# Altium PCB pyBehaviorLab_breakout_board.PcbDoc (part 1 of 4)
Units mm, origin at the board's own origin, x right, y up, seen from the top; angles counter-clockwise.
Board outline 190.01 x 159.89 mm, 2 copper layers (Top Layer, Bottom Layer); 146 components, 148 nets, 758 pads, 634 vias.
Unrouted connection lines stored in the file: 29.
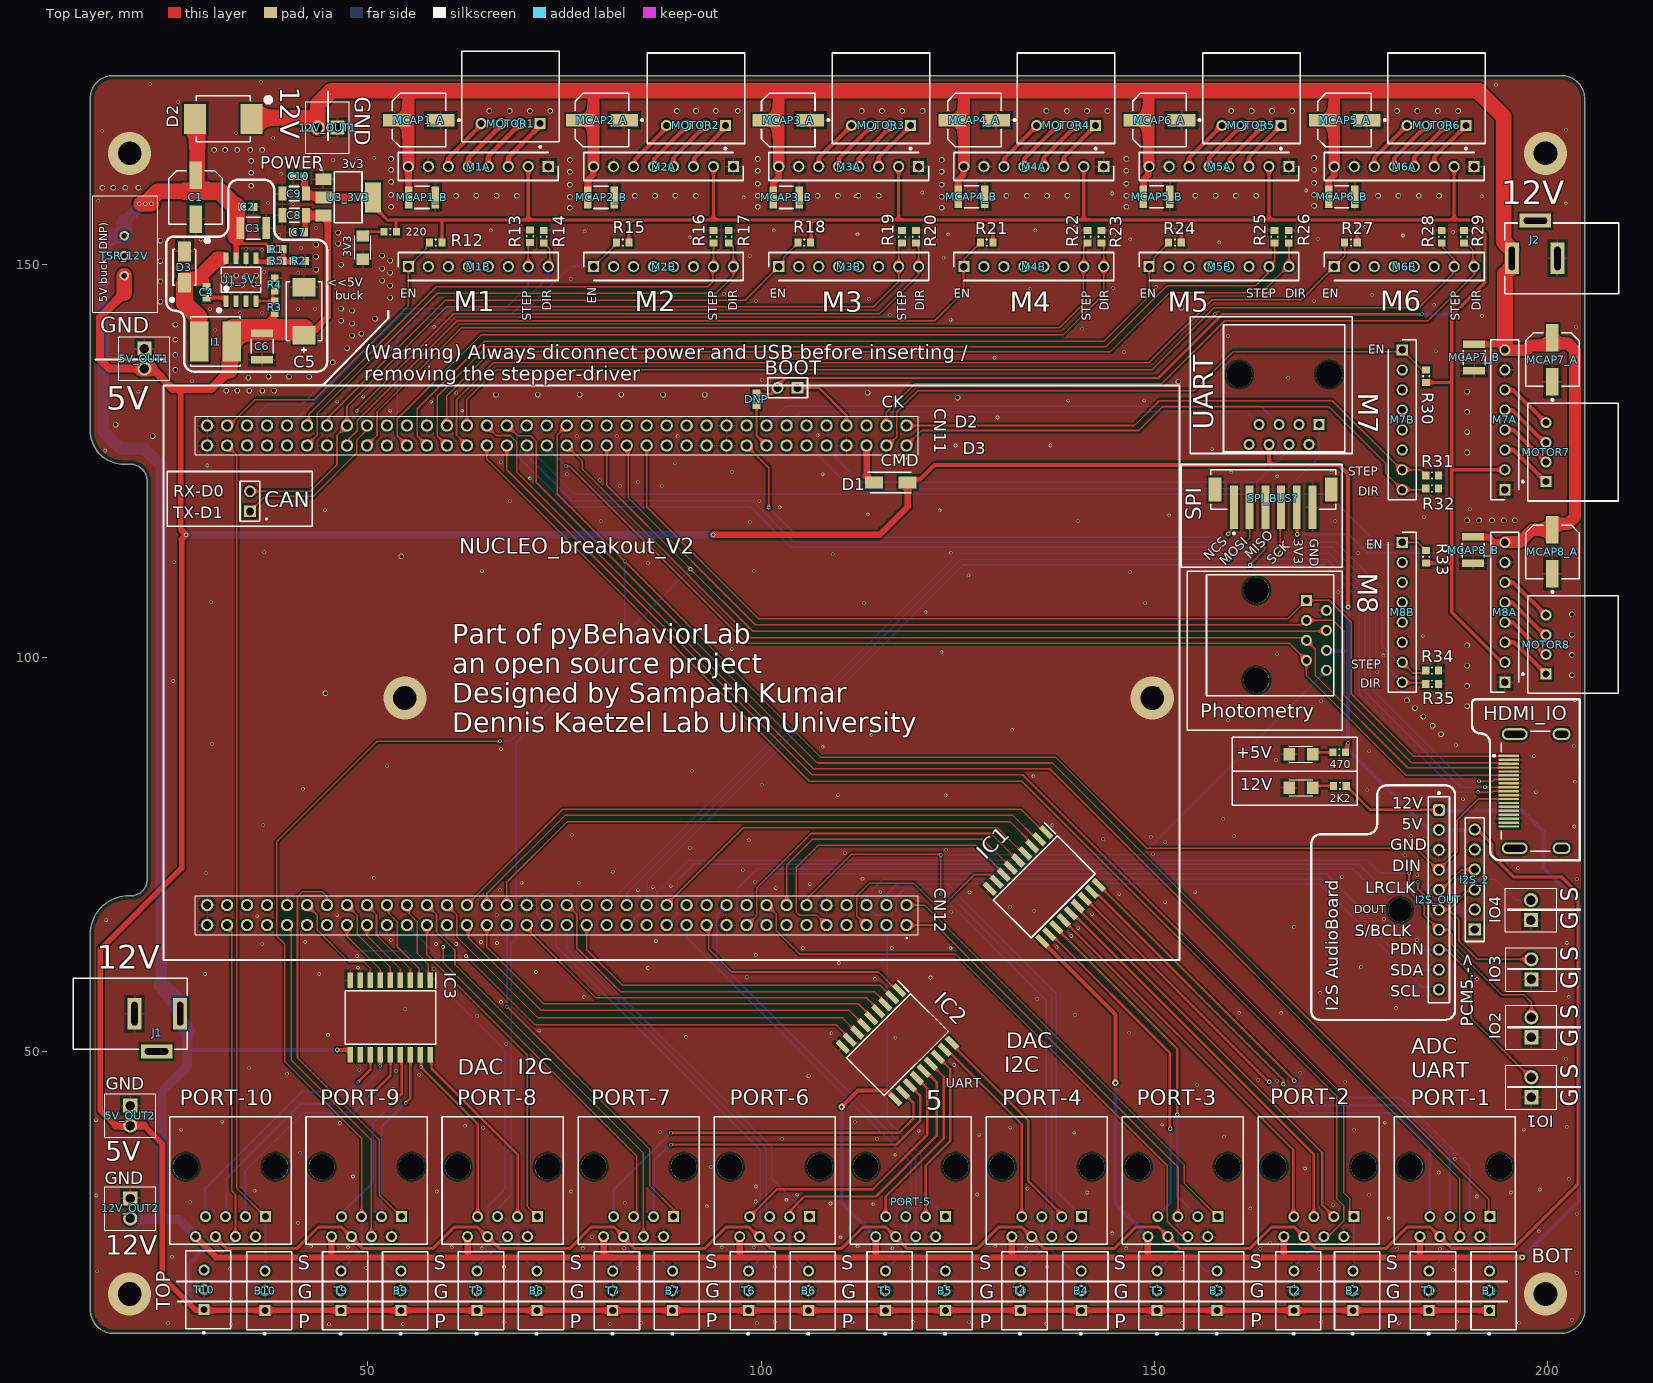
[diagram p0: Top Layer view]
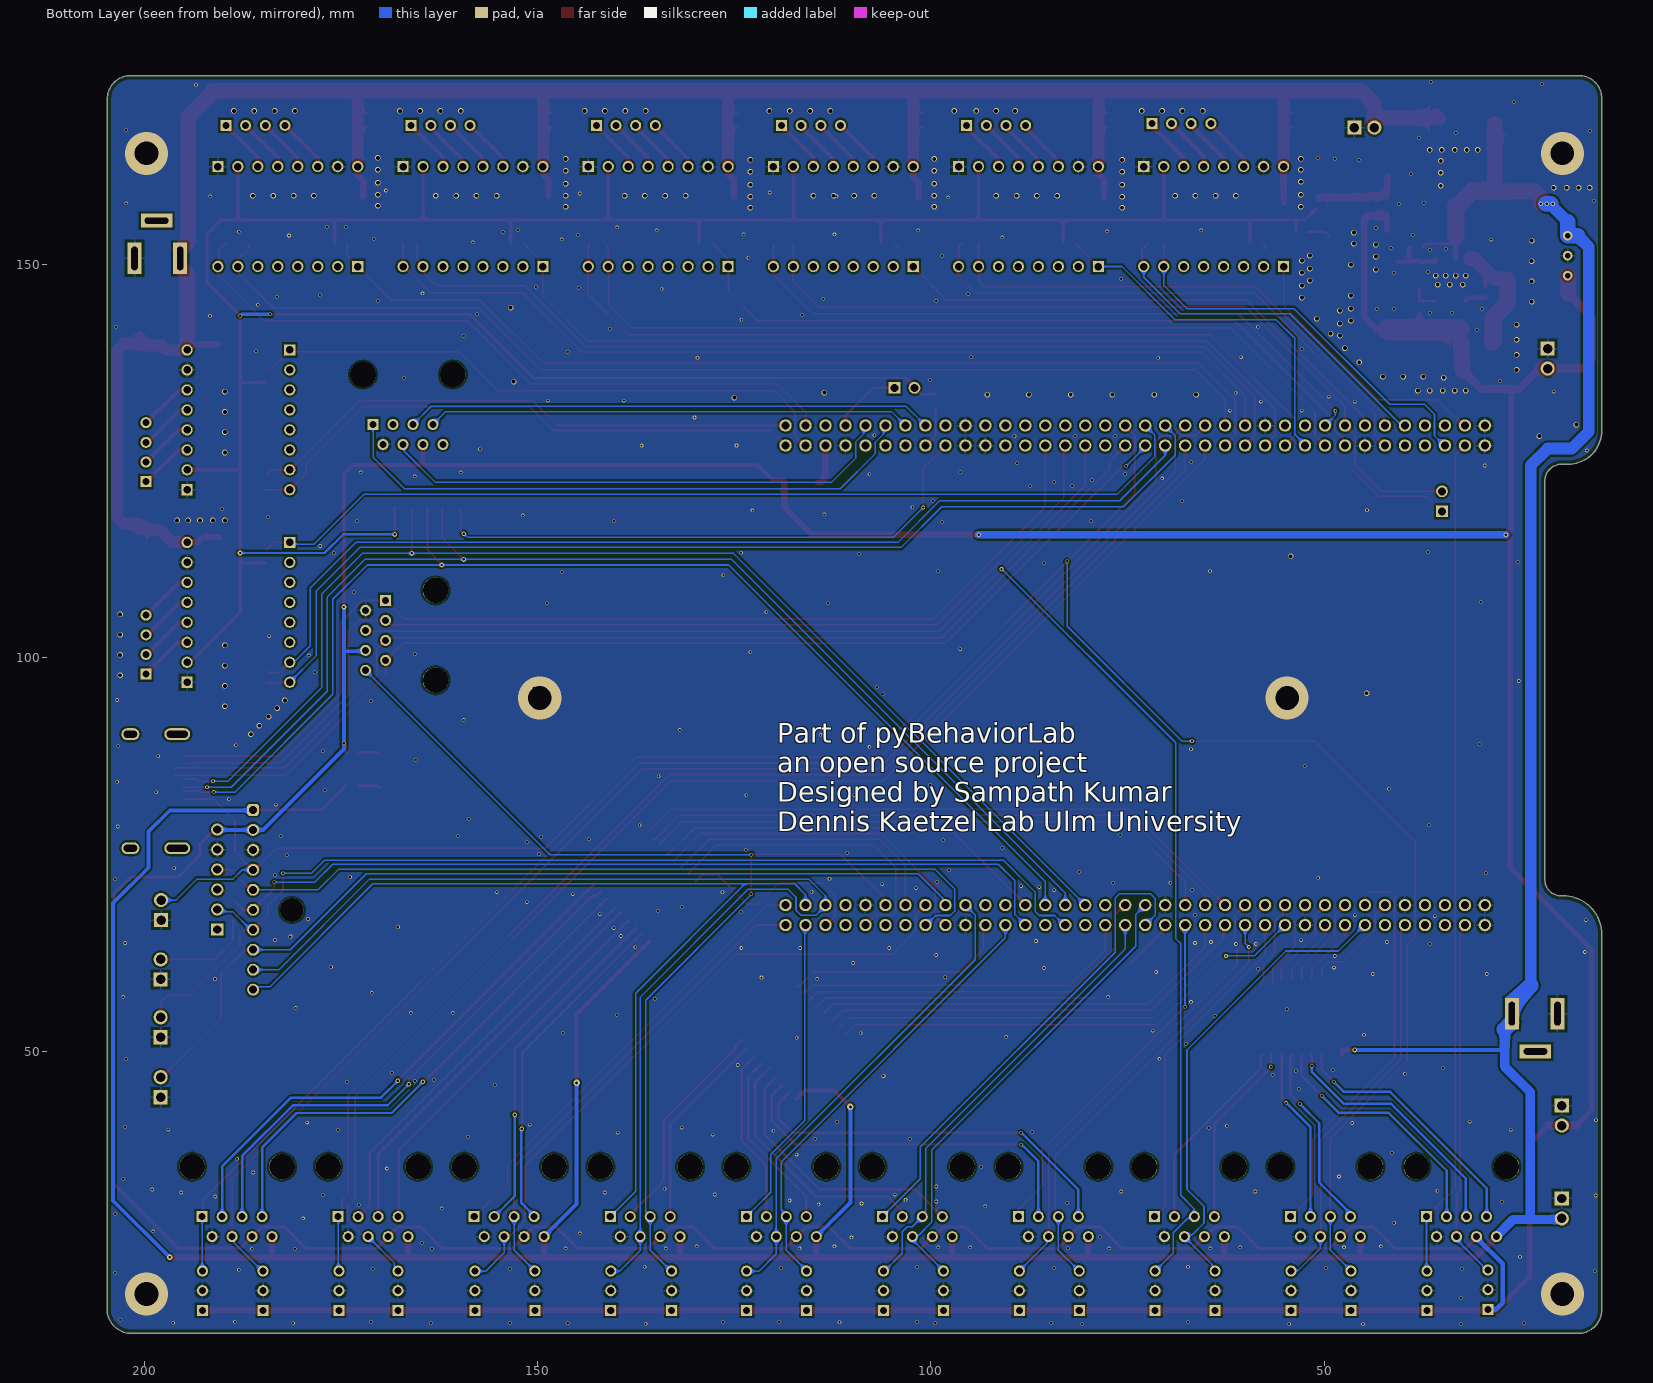
[diagram p1: Bottom Layer view, seen from below]
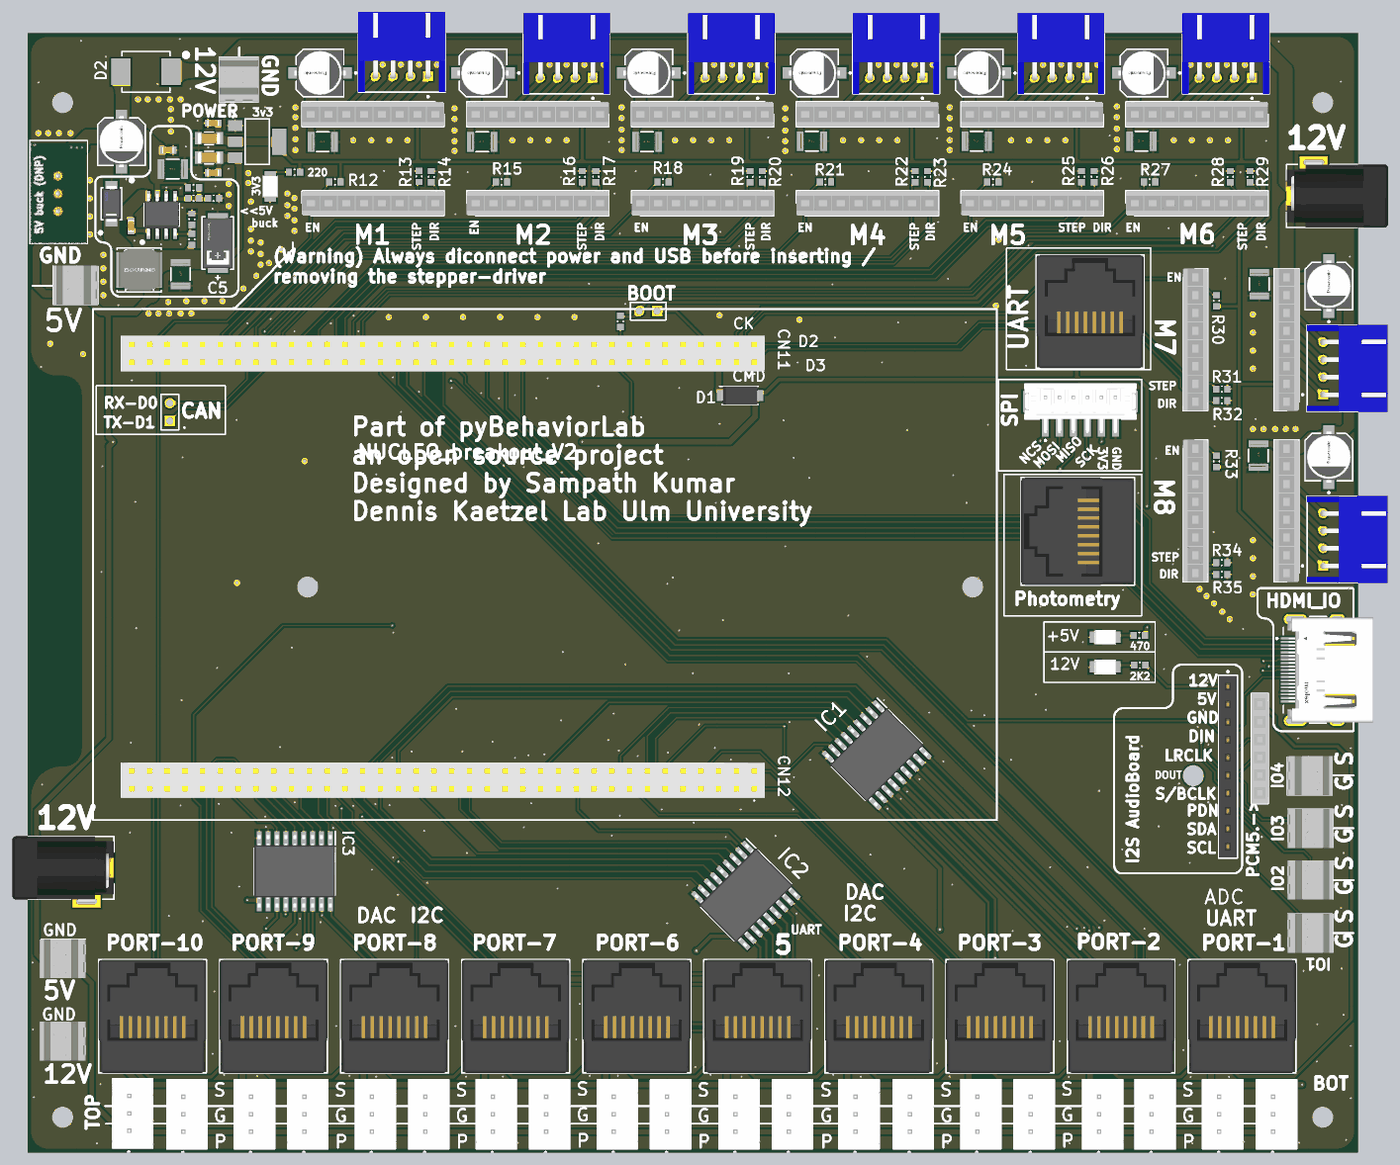
[diagram p4: 3D render of the assembled board from above, using the file's embedded part models]

## Layer stack, top to bottom
Top Solder: solder mask 0.0102, Solder Resist, Dk 3.5
Top Layer: signal copper 0.0356
Dielectric 1: dielectric 0.32, FR-4, Dk 4.8
Bottom Layer: signal copper 0.0356
Bottom Solder: solder mask 0.0102, Solder Resist, Dk 3.5

## Board outline
14.714,17.114 14.714,64.857 cw(c19.615,64.857) 19.615,69.758 19.899,69.758 ccw(c19.899,71.811) 21.953,71.811 21.953,122.468 ccw(c19.8,122.468) 19.8,124.622 18.978,124.622 cw(c18.978,128.886) 14.714,128.886 14.714,171.141 cw(c17.598,171.141) 17.598,174.025 201.732,174.025 cw(c201.732,171.05) 204.706,171.05 204.706,171.069 204.706,17.222 ccw(c204.722,17.222) 204.722,17.205 cw(c201.648,17.205) 201.648,14.132 17.697,14.132 cw(c17.697,17.114)

## Design rules (kind name [scope] priority, off if disabled: settings)
BoardOutlineClearance [All] p1: gap=0.254 ignorepadtopadclearanceinfootprint=FALSE except(0: Arc-SplitContinuation Track-SplitContinuation SMDPad-SplitContinuation THPad-SplitContinuation Via-SplitContinuation Fill-SplitContinuation Poly-SplitContinuation Region-SplitContinuation Text-SplitContinuation; 0.5: Poly-OutlineEdge Poly-CavityEdge Poly-CutoutEdge Poly-SplitBarrior)
Clearance [All] p1: gap=0.254 ignorepadtopadclearanceinfootprint=FALSE except(0.127: Arc-Arc Arc-Track Track-Track SMDPad-SMDPad; 0.2: Arc-SMDPad Track-SMDPad; 0.33: Arc-THPad Track-THPad; 0.5: THPad-THPad)
DiffPairsRouting [All] p1: maxlimit=0.203 minlimit=0.203 mostfreqgap=0.203 toplayer_minwidth=0.109 toplayer_maxwidth=0.19 toplayer_prefwidth=0.111 bottomlayer_minwidth=0.109 bottomlayer_maxwidth=0.19 bottomlayer_prefwidth=0.111 impedanceprofiledriven=TRUE maxuncoupledlength=12.7
MatchedLengths MatchedLengths_QSPI2 [InNetClass('QSPI')] p1: tolerance=7 checknetsindiffpair=FALSE checkdiffpairvsdiffpair=TRUE checkxsignals=TRUE checkothers=TRUE
PlaneClearance [All] p1: clearance=0.6
PlaneConnect [All] p1: pad.planeconnectstyle=Relief pad.reliefexpansion=0.508 pad.reliefentries=4 pad.reliefconductorwidth=0.254 pad.reliefairgap=0.254 via.planeconnectstyle=Direct via.reliefexpansion=0.508 via.reliefentries=4 via.reliefconductorwidth=0.254 via.reliefairgap=0.254
PolygonConnect [All] p1: thpad.connectstyle=Relief thpad.reliefconductorwidth=0.254 thpad.reliefentries=4 thpad.polygonreliefangle="90 Angle" thpad.airgapwidth=0.35 smdpad.connectstyle=Relief smdpad.reliefconductorwidth=0.254 smdpad.reliefentries=4 smdpad.polygonreliefangle="90 Angle" smdpad.airgapwidth=0.35 via.connectstyle=Direct via.reliefconductorwidth=0.254 via.reliefentries=4 via.polygonreliefangle="90 Angle" via.airgapwidth=0.254
RoutingVias [All] p1: holewidth=0.2 width=0.45 viastyle="Through Hole" minholewidth=0.2 minwidth=0.4 maxholewidth=3 maxwidth=5
SolderMaskExpansion [All] p1: expansion=0.102 istentingtop=FALSE
SupplyNets "Schematic Supply Nets_10" [InNet('GND')] p1: voltage=0.000
SupplyNets "Schematic Supply Nets_7" [InNet('MCU_5V')] p2: voltage=0.000
SupplyNets "Schematic Supply Nets_6" [InNet('+12V_motor')] p3: voltage=0.000
SupplyNets "Schematic Supply Nets_5" [InNet('+3V3')] p4: voltage=0.000
SupplyNets "Schematic Supply Nets_4" [InNet('+5V_CL')] p5: voltage=0.000
SupplyNets "Schematic Supply Nets_3" [InNet('MCU_3V3')] p6: voltage=0.000
SupplyNets "Schematic Supply Nets_2" [InNet('+12V')] p7: voltage=0.000
SupplyNets "Schematic Supply Nets_1" [InNet('+5V')] p8: voltage=0.000
UnRoutedNet [All] p1: checkbadconnections=TRUE
Width [All] p1: maxlimit=5 minlimit=0.1 preferedwidth=0.2 minimp=50.000000 maximp=50.000000 favimp=50.000000
26 further rules are at their usual default settings.

## Classes and differential pairs
component class pyBehaviorLab_breakout_board: 5V_OUT1 5V_OUT2 12V_OUT1 12V_OUT2 B1 B2 B3 B4 B5 B6 B7 B8 B9 B10 BOOT C1 C2 C3 C4 C5 C6 C7 C8 C9 C10 CN11 CN12 D1 D2 D3 DNP HDMI_IO I1 IC1 IC2 IC3 IO1 IO2 IO3 IO4 J1 J2 M1A M1B M2A M2B M3A M3B M4A M4B M5A M5B M6A M6B M7A M7B M8A M8B MCAP1_A MCAP1_B MCAP2_A MCAP2_B MCAP3_A MCAP3_B MCAP4_A MCAP4_B MCAP5_A MCAP5_B MCAP6_A MCAP6_B MCAP7_A MCAP7_B MCAP8_A MCAP8_B MOTOR1 MOTOR2 MOTOR3 MOTOR4 MOTOR5 MOTOR6 MOTOR7 MOTOR8 Photometry PORT-1 PORT-2 PORT-3 PORT-4 PORT-5 PORT-6 PORT-7 PORT-8 PORT-9 PORT-10 R1 R2 R3 R4 R12 R13 R14 R15 R16 R17 R18 R19 R20 R21 R22 R23 R24 R25 R26 R27 R28 R29 R30 R31 R32 R33 R34 R35 SPI_BUS? T1 T2 T3 T4 T5 T6 T7 T8 T9 T10 TSR_12V U1_5V_ UART

## Components (designator, comment, footprint, x,y, rotation, side; value= is the part's Value field where it differs from the comment)
2K2 "2K2" 0603R 173.582,83.73 r0 top value=12K1
3V3 "LTW-150TK" SML010PTT86 49.365,152.159 r180 top
5V_OUT1 "282834-2" 282834-2_1 21.59,139.319 r270 top
5V_OUT2 "282834-2" 282834-2_1 19.794,43.088 r270 top
12V "LTW-150TK" SML010PTT86 168.628,83.485 r90 top
12V_OUT1 "282834-2" 282834-2_1 46.159,167.421 r180 top
12V_OUT2 "282834-2" 282834-2_1 19.794,31.277 r270 top
220 "2K2" 0603R 52.842,154.176 r0 top value=12K1
470 "2K2" 0603R 173.511,87.998 r0 top value=12K1
+5V "LTW-150TK" SML010PTT86 168.628,87.739 r90 top
B1 "B3B-XH-A(LF)(SN)" FP-B3B-XH-A_LF_SN-MFG 193.122,19.558 r90 top
B2 "B3B-XH-A(LF)(SN)" FP-B3B-XH-A_LF_SN-MFG 175.768,19.558 r90 top
B3 "B3B-XH-A(LF)(SN)" FP-B3B-XH-A_LF_SN-MFG 158.496,19.558 r90 top
B4 "B3B-XH-A(LF)(SN)" FP-B3B-XH-A_LF_SN-MFG 141.224,19.558 r90 top
B5 "B3B-XH-A(LF)(SN)" FP-B3B-XH-A_LF_SN-MFG 123.952,19.558 r90 top
B6 "B3B-XH-A(LF)(SN)" FP-B3B-XH-A_LF_SN-MFG 106.553,19.558 r90 top
B7 "B3B-XH-A(LF)(SN)" FP-B3B-XH-A_LF_SN-MFG 89.281,19.558 r90 top
B8 "B3B-XH-A(LF)(SN)" FP-B3B-XH-A_LF_SN-MFG 72.009,19.558 r90 top
B9 "B3B-XH-A(LF)(SN)" FP-B3B-XH-A_LF_SN-MFG 54.737,19.558 r90 top
B10 "B3B-XH-A(LF)(SN)" FP-B3B-XH-A_LF_SN-MFG 37.465,19.558 r90 top
BOOT "JP2" HDR_1x2_2R54_V_M_S 104.626,134.331 r180 top
C1 "25SVPF47M" FP-OS-CON-SMT-C6-MFG 28.115,158.552 r90 top
C2 "GRM188R71H104KA93D" CAPC1608X90X35ML10T15 34.767,157.334 r180 top
C3 "" FP-CGA6P-IPC_B 35.445,154.632 r0 top
C4 "GRM188R71H104KA93D" CAPC1608X90X35ML10T15 29.497,146.483 r270 top
C5 "10TPC100M" FP-POSCAP-D2-MFG 41.876,144.066 r270 top
C6 "" FP-CGA6P-IPC_B 36.558,139.608 r270 top
C7 "GRM188R71H104KA93D" CAPC1608X90X35ML10T15 41.208,154.099 r0 top
C8 "CC1206KKX5R8BB105" FP-CC1206-1_25-MFG 40.636,156.272 r180 top value="1 uF"
C9 "CC1206KKX5R8BB105" FP-CC1206-1_25-MFG 40.633,159.026 r180 top value="1 uF"
C10 "GRM188R71H104KA93D" CAPC1608X90X35ML10T15 41.208,161.199 r0 top
CAN "JP2" HDR_1x2_2R54_V_M_S 35.017,118.64 r90 top
CN11 "SSW-136-01-S-D" SSW-136-XX-YYY-D 118.473,127 r0 top
CN12 "SSW-136-01-S-D" SSW-136-XX-YYY-D 118.473,66.04 r0 top locked
D1 "MBRA140T3G" DIOM5226X220N 116.48,122.286 r0 top
D2 "MBRS540T3G" ONSC-SMC-2-403-03_V 31.623,168.529 r180 top
D3 "B340A-13-F" FP-SMA-MFG 26.689,149.67 r90 top
DNP "10K" 0603R 99.401,132.867 r270 top value=12K1
HDMI_IO "47151-0001" FP-47151-0001-MFG 200.279,83.058 r90 top
I1 "SRN6045TA-220M" FP-SRN6045TA-MFG 30.647,140.202 r0 top
I2S_2 "Comment" SMTC-SSW-106-02-X-S 190.724,65.472 r90 top
I2S_OUT "61301011821" 61301011821 186.164,69.25 r270 top
IC1 "TBD62083AFWG,EL" SOIC127P1032X285-18N 135.999,70.901 r315 top locked
IC2 "TBD62083AFWG,EL" SOIC127P1032X285-18N 117.33,50.835 r315 top
IC3 "TBD62083AFWG,EL" SOIC127P1032X285-18N 52.875,54.278 r270 top
IO1 "282834-2" 282834-2_1 197.914,44.15 r90 top
IO2 "282834-2" 282834-2_1 197.914,51.77 r90 top
IO3 "282834-2" 282834-2_1 197.914,59.136 r90 top
IO4 "282834-2" 282834-2_1 197.866,66.675 r90 top
J1 "694106301002" 694106301002 19.794,54.772 r270 top
J2 "694106301002" 694106301002 201.785,150.784 r90 top
M1A "5-535541-6" RHDR8W76P0X254_1X8_2032X356X673P 72.938,162.467 r180 top
M1B "5-535541-6" RHDR8W76P0X254_1X8_2032X356X673P 55.162,149.753 r0 top
M2A "5-535541-6" RHDR8W76P0X254_1X8_2032X356X673P 96.479,162.467 r180 top
M2B "5-535541-6" RHDR8W76P0X254_1X8_2032X356X673P 78.702,149.753 r0 top
M3A "5-535541-6" RHDR8W76P0X254_1X8_2032X356X673P 120.02,162.467 r180 top
M3B "5-535541-6" RHDR8W76P0X254_1X8_2032X356X673P 102.243,149.753 r0 top
M4A "5-535541-6" RHDR8W76P0X254_1X8_2032X356X673P 143.561,162.467 r180 top
M4B "5-535541-6" RHDR8W76P0X254_1X8_2032X356X673P 125.783,149.753 r0 top
M5A "5-535541-6" RHDR8W76P0X254_1X8_2032X356X673P 167.102,162.467 r180 top
M5B "5-535541-6" RHDR8W76P0X254_1X8_2032X356X673P 149.323,149.753 r0 top
M6A "5-535541-6" RHDR8W76P0X254_1X8_2032X356X673P 190.643,162.467 r180 top
M6B "5-535541-6" RHDR8W76P0X254_1X8_2032X356X673P 172.863,149.753 r0 top
M7A "5-535541-6" RHDR8W76P0X254_1X8_2032X356X673P 194.55,121.37 r90 top
M7B "5-535541-6" RHDR8W76P0X254_1X8_2032X356X673P 181.503,139.15 r270 top
M8A "5-535541-6" RHDR8W76P0X254_1X8_2032X356X673P 194.55,96.903 r90 top
M8B "5-535541-6" RHDR8W76P0X254_1X8_2032X356X673P 181.503,114.683 r270 top
MCAP1_A "25SVPF47M" FP-OS-CON-SMT-C6-MFG 56.483,168.368 r180 top
MCAP1_B "" FP-CGA6P-IPC_B 56.877,158.531 r0 top
MCAP2_A "25SVPF47M" FP-OS-CON-SMT-C6-MFG 79.77,168.368 r180 top
MCAP2_B "" FP-CGA6P-IPC_B 79.656,158.531 r0 top
MCAP3_A "25SVPF47M" FP-OS-CON-SMT-C6-MFG 103.451,168.368 r180 top
MCAP3_B "" FP-CGA6P-IPC_B 103.197,158.531 r0 top
MCAP4_A "25SVPF47M" FP-OS-CON-SMT-C6-MFG 127.109,168.368 r180 top
MCAP4_B "" FP-CGA6P-IPC_B 126.738,158.623 r0 top
MCAP5_A "25SVPF47M" FP-OS-CON-SMT-C6-MFG 174.182,168.368 r180 top
MCAP5_B "" FP-CGA6P-IPC_B 150.278,158.623 r0 top
MCAP6_A "25SVPF47M" FP-OS-CON-SMT-C6-MFG 150.641,168.368 r180 top
MCAP6_B "" FP-CGA6P-IPC_B 173.819,158.623 r0 top
MCAP7_A "25SVPF47M" FP-OS-CON-SMT-C6-MFG 200.584,137.911 r90 top
MCAP7_B "" FP-CGA6P-IPC_B 190.644,138.193 r270 top
MCAP8_A "25SVPF47M" FP-OS-CON-SMT-C6-MFG 200.584,113.485 r90 top
MCAP8_B "" FP-CGA6P-IPC_B 190.517,113.695 r270 top
MOTOR1 "S4B-XH-A(LF)(SN)" JST-S4B-XH-A(LF)(SN)_V 68.158,167.929 r180 top
MOTOR2 "S4B-XH-A(LF)(SN)" JST-S4B-XH-A(LF)(SN)_V 91.699,167.697 r180 top
MOTOR3 "S4B-XH-A(LF)(SN)" JST-S4B-XH-A(LF)(SN)_V 115.24,167.697 r180 top
MOTOR4 "S4B-XH-A(LF)(SN)" JST-S4B-XH-A(LF)(SN)_V 138.781,167.697 r180 top
MOTOR5 "S4B-XH-A(LF)(SN)" JST-S4B-XH-A(LF)(SN)_V 162.322,167.697 r180 top
MOTOR6 "S4B-XH-A(LF)(SN)" JST-S4B-XH-A(LF)(SN)_V 185.863,167.697 r180 top
MOTOR7 "S4B-XH-A(LF)(SN)" JST-S4B-XH-A(LF)(SN)_V 199.781,126.15 r90 top
MOTOR8 "S4B-XH-A(LF)(SN)" JST-S4B-XH-A(LF)(SN)_V 199.781,101.683 r90 top
Photometry "615008138021" 615008138021 164.719,102.87 r270 top locked
PORT-1 "615008138021" 615008138021 188.195,33.563 r180 top locked
PORT-2 "615008138021" 615008138021 170.901,33.563 r180 top locked
PORT-3 "615008138021" 615008138021 153.606,33.563 r180 top locked
PORT-4 "615008138021" 615008138021 136.312,33.563 r180 top locked
PORT-5 "615008138021" 615008138021 119.017,33.563 r180 top locked
PORT-6 "615008138021" 615008138021 101.722,33.563 r180 top locked
PORT-7 "615008138021" 615008138021 84.428,33.563 r180 top locked
PORT-8 "615008138021" 615008138021 67.133,33.563 r180 top locked
PORT-9 "615008138021" 615008138021 49.839,33.563 r180 top locked
PORT-10 "615008138021" 615008138021 32.544,33.563 r180 top locked
R1 "680K" 0603R 38.414,151.976 r0 top value=12K1
R2 "100K" 0603R 41.263,150.476 r0 top value=12K1
R3 "10K" 0603R 38.168,144.591 r90 top value=12K1
R4 "3K2" 0603R 38.168,147.464 r90 top value=12K1
R5 "100K" 0603R 38.414,150.476 r0 top value=12K1
R12 "10K" 0603R 58.616,152.787 r180 top value=12K1
R13 "10K" 0603R 70.612,153.584 r90 top value=12K1
R14 "10K" 0603R 72.366,153.537 r90 top value=12K1
R15 "10K" 0603R 82.399,152.787 r180 top value=12K1
R16 "10K" 0603R 93.944,153.537 r90 top value=12K1
R17 "10K" 0603R 95.888,153.537 r90 top value=12K1
R18 "10K" 0603R 105.481,152.787 r180 top value=12K1
R19 "10K" 0603R 117.908,153.537 r90 top value=12K1
R20 "10K" 0603R 119.685,153.537 r90 top value=12K1
R21 "10K" 0603R 128.677,152.787 r180 top value=12K1
R22 "10K" 0603R 141.489,153.537 r90 top value=12K1
R23 "10K" 0603R 143.291,153.537 r90 top value=12K1
R24 "10K" 0603R 152.606,152.787 r180 top value=12K1
R25 "10K" 0603R 165.27,153.537 r90 top value=12K1
R26 "10K" 0603R 167.071,153.537 r90 top value=12K1
R27 "10K" 0603R 174.987,152.787 r180 top value=12K1
R28 "10K" 0603R 186.523,153.537 r90 top value=12K1
R29 "10K" 0603R 189.357,153.543 r90 top value=12K1
R30 "10K" 0603R 184.537,135.811 r90 top value=12K1
R31 "10K" 0603R 185.287,123.208 r0 top value=12K1
R32 "10K" 0603R 185.287,121.545 r0 top value=12K1
R33 "10K" 0603R 184.537,112.868 r90 top value=12K1
R34 "10K" 0603R 185.287,98.38 r0 top value=12K1
R35 "10K" 0603R 185.287,96.703 r0 top value=12K1
SPI_BUS? "B6B-PH-SM4-TB(LF)(SN)" FP-B6B-PH-SM4-TB_LF_SN-MFG 165.1,121.412 r0 top locked
T1 "B3B-XH-A(LF)(SN)" FP-B3B-XH-A_LF_SN-MFG 185.42,19.558 r90 top
T2 "B3B-XH-A(LF)(SN)" FP-B3B-XH-A_LF_SN-MFG 168.275,19.558 r90 top
T3 "B3B-XH-A(LF)(SN)" FP-B3B-XH-A_LF_SN-MFG 150.876,19.558 r90 top
T4 "B3B-XH-A(LF)(SN)" FP-B3B-XH-A_LF_SN-MFG 133.477,19.558 r90 top
T5 "B3B-XH-A(LF)(SN)" FP-B3B-XH-A_LF_SN-MFG 116.332,19.558 r90 top
T6 "B3B-XH-A(LF)(SN)" FP-B3B-XH-A_LF_SN-MFG 98.933,19.558 r90 top
T7 "B3B-XH-A(LF)(SN)" FP-B3B-XH-A_LF_SN-MFG 81.661,19.558 r90 top
T8 "B3B-XH-A(LF)(SN)" FP-B3B-XH-A_LF_SN-MFG 64.389,19.558 r90 top
T9 "B3B-XH-A(LF)(SN)" FP-B3B-XH-A_LF_SN-MFG 47.117,19.558 r90 top
T10 "B3B-XH-A(LF)(SN)" FP-B3B-XH-A_LF_SN-MFG 29.718,19.685 r90 top
TSR_12V "TSR 2-2450" "TSR 2-2450_TRP" 19.05,153.67 r270 top
U1_5V_ "TPS5420DR" D0008A_N 33.881,148.088 r90 top
U3_3V3 "NCP1117ST33T3G" ONSC-SOT-223-4-318H-01_A_V 47.51,158.547 r0 top
UART "615008138021" 615008138021 166.479,134.274 r180 top locked

## Footprints (in the part's own frame and the unit in brackets; to place one, negate y for a bottom-side part, rotate by r counter-clockwise, add the part's x,y. Pads: shape width x height; smd on the part's side, far side on the other; paste and mask are expansions set on the pad)
0603R [mm] "Chip Resistor, Body 1.6x0.8mm, IPC Medium Density"
  rect 0.9x1 smd: 1(-0.8,0) 2(0.8,0)
  silkscreen extent -0.05,-0.4 0.05,0.4, body extent -0.85,-0.47 0.85,0.47, height 0.6
282834-2_1 [mm]
  rect 1.8x1.8 hole 1.2: 1(0,0)
  round 1.8 hole 1.2: 2(2.54,0)
  silkscreen extent -1.5,-3.25 4.04,3.25, body extent -1.5,-3.25 4.04,3.25, height 9.87
61301011821 [mm] "Socket Header, Pitch 2.54 mm, THT, Vertical, single row, 10p"
  rrect50% 1.52x1.52 hole 1.02: 1(-11.43,0)
  round 1.52 hole 1.02: 2(-8.89,0) 3(-6.35,0) 4(-3.81,0) 5(-1.27,0) 6(1.27,0) 7(3.81,0) 8(6.35,0) 9(8.89,0) 10(11.43,0)
  silkscreen extent -13.68,-1.35 13.08,1.35, body extent -12.95,-1.25 12.95,1.25, height 8.55
615008138021 [mm] "Modular Jack Vertical Plastic 8P8C"
  rect 1.4x1.4 hole 0.9: 1(-4.445,4.6)
  round 1.4 hole 0.9: 2(-3.175,7.14) 3(-1.905,4.6) 4(-0.635,7.14) 5(0.635,4.6) 6(1.905,7.14) 7(3.175,4.6) 8(4.445,7.14)
  round 3.25 hole 3.25 unplated: MH1(-5.715,-1.75) MH2(5.715,-1.75)
  silkscreen extent -7.7,-8.1 7.7,8.1, body extent -7.7,-8.1 7.7,8.1, height 16.5
694106301002 [mm] "DC Power Jack Right Angled(6.4)"
  rect 4x1.8 hole 0.8 slot 3 at 0 deg: 1(0,6.35) 2(0,0.55)
  rect 1.8x4 hole 0.8 slot 3 at 90 deg: 3(4.8,3.35)
  silkscreen extent -4.5,-7.25 4.5,7.25, body extent -4.5,-7.25 5,7.25, height 10.75
CAPC1608X90X35ML10T15 [mm] "Chip Capacitor, 2-Leads, Body 1.7x0.9mm, IPC Low Density"
  rect 0.95x1.05 smd: 1(-0.725,0) 2(0.725,0)
  body extent -0.85,-0.45 0.85,0.45, height 0.9
D0008A_N [mm] "SOIC, 8-Leads, Body 5x4mm, Pitch 1.27mm, IPC Medium Density"
  rrect17% 1.45x0.6 smd: 1(-2.725,1.905) 2(-2.725,0.635) 3(-2.725,-0.635) 4(-2.725,-1.905) 5(2.725,-1.905) 6(2.725,-0.635) 7(2.725,0.635) 8(2.725,1.905)
  silkscreen extent -4.11,-2.5 1.6,2.98, body extent -3,-2.45 3,2.45, height 1.63
DIOM5226X220N [mm]
  rect 2.3x1.55 smd: 1(-2.15,0) 2(2.15,0)
  silkscreen extent -2.93,-1.3 2.61,1.3, body extent -2.61,-1.3 2.61,1.3, height 2.2
FP-47151-0001-MFG [mm]
  rect 0.3x2.6 smd paste+0 mask+0: 1(4.5,5.235) 2(4,5.235) 3(3.5,5.235) 4(3,5.235) 5(2.5,5.235) 6(2,5.235) 7(1.5,5.235) 8(1,5.235) 9(0.5,5.235) 10(0,5.235) 11(-0.5,5.235) 12(-1,5.235) 13(-1.5,5.235) 14(-2,5.235) 15(-2.5,5.235) 16(-3,5.235) 17(-3.5,5.235) 18(-4,5.235) 19(-4.5,5.235)
  rrect100% 1.5x3.3 hole 2.7 slot 0.9 at 0 deg paste-2539.97 mask+0: 20(-7.25,4.475) 21(7.25,4.475)
  rrect100% 1.5x2.3 hole 1.7 slot 0.9 at 0 deg paste-2539.97 mask+0: 22(-7.25,-1.485) 23(7.25,-1.485)
  silkscreen extent -7.63,0.04 7.63,7.23, body extent -8.1,-6.3 8.1,6.63, height 0.25
FP-B3B-XH-A_LF_SN-MFG [mm]
  rect 1.4x1.4 hole 0.9 paste-2539.97 mask+0: 1(-2.5,0.525)
  round 1.4 hole 0.9 paste-2539.97 mask+0: 2(0,0.525) 3(2.5,0.525)
  silkscreen extent -5.6,-2.88 4.95,2.88, body extent -5.05,-2.97 5.05,2.98, height 0.25
FP-B6B-PH-SM4-TB_LF_SN-MFG [mm]
  rect 1x5.5 smd paste+0 mask+0: 1(-5,-2.25) 2(-3,-2.25) 3(-1,-2.25) 4(1,-2.25) 5(3,-2.25) 6(5,-2.25)
  rect 1.6x3 smd paste+0 mask+0: 7(-7.4,0) 8(7.4,0)
  silkscreen extent -7.95,-5.7 7.95,2.5, body extent -8.3,-5.1 8.3,2.6, height 0.25
FP-CC1206-1_25-MFG [mm]
  rect 1x1.8 smd paste+0 mask+0: 1(-1.5,0) 2(1.5,0)
  silkscreen extent -0.63,-0.9 0.63,0.9, body extent -2.2,-1.25 2.2,1.25, height 0.25
FP-CGA6P-IPC_B [mm]
  rect 0.953x2.804 smd paste+0 mask+0: 1(-1.675,0) 2(1.675,0)
  silkscreen extent -0.9,-1.4 0.9,1.4, body extent -2.4,-1.65 2.4,1.65, height 0.25
FP-OS-CON-SMT-C6-MFG [mm]
  rect 3.5x1.6 smd paste+0 mask+0: 1(-2.8,0) 2(2.8,0)
  silkscreen extent -5.72,-3.4 3.4,3.4, body extent -4.8,-3.65 4.8,3.65, height 0.25
FP-POSCAP-D2-MFG [mm]
  rect 2.4x2.9 smd paste+0 mask+0: 1(-3.05,0) 2(3.05,0)
  silkscreen extent -3.75,-2.25 5.23,2.25, body extent -4.35,-2.35 4.35,2.35, height 0.25
FP-SMA-MFG [mm]
  rect 2.5x1.7 smd paste+0 mask+0: 1(-2,0) 2(2,0)
  silkscreen extent -4.35,-1.46 2.3,1.77, body extent -3.35,-1.56 3.35,1.56, height 0.25
FP-SRN6045TA-MFG [mm]
  rect 2.35x5.1 smd paste+0 mask+0: 1(-2.075,0) 2(2.075,0)
  silkscreen extent -3.15,-3.15 3.15,3.15, body extent -3.35,-3.25 3.35,3.25, height 0.25
HDR_1x2_2R54_V_M_S [mm] "Male Header, Pitch 2.54mm, 4x1 Position, Mated Height 6mm, Tail Length 3mm"
  rect 1.5x1.5 hole 1.02: 1(0,0)
  round 1.5 hole 1.02: 2(2.54,0)
  silkscreen extent -1.27,-2.14 3.81,1.27, body extent -1.27,-1.27 3.81,1.27, height 9
JST-S4B-XH-A(LF)(SN)_V [mm] "Header, 4-Leads, Body 12.4x11.5mm, Pitch 2.5mm"
  rect 1.4x1.4 hole 0.9: 1(-3.75,0)
  round 1.4 hole 0.9: 2(-1.25,0) 3(1.25,0) 4(3.75,0)
  silkscreen extent -6.2,-9.2 6.2,3.08, body extent -6.2,-9.2 6.2,2.3, height 6.15
ONSC-SMC-2-403-03_V [mil] "Molded, 2-Leads, Body 6.86x5.84mm"
  rect 110x150 smd: 1(-140.49,0) 2(140.49,0)
  silkscreen extent -235,-115 135,115, body extent -135,-115 135,115, height 99
ONSC-SOT-223-4-318H-01_A_V [mm] "SOT223, 4-Leads, Body 6.5x3.5mm, Pitch 2.3mm"
  rect 2x1.5 smd: 1(-3.15,2.3) 2(-3.15,0) 3(-3.15,-2.3)
  rect 2x3.8 smd: 4(3.15,0)
  silkscreen extent -3.55,-3.25 1.75,3.72, body extent -1.75,-3.25 1.75,3.25, height 1.8
RHDR8W76P0X254_1X8_2032X356X673P [mm]
  rect 1.425x1.425 hole 0.95: 1(0,0)
  round 1.425 hole 0.95: 2(2.54,0) 3(5.08,0) 4(7.62,0) 5(10.16,0) 6(12.7,0) 7(15.24,0) 8(17.78,0)
  silkscreen extent -1.27,-1.78 19.05,1.78, body extent -1.27,-1.78 19.05,1.78, height 6.73
SML010PTT86 [mm]
  rect 1.6x1.45 smd: 1(0,1.475) 2(0,-1.475)
  silkscreen extent -1,-1.5 1,1.5, body extent -1,-1.52 1,1.52, height 1.5
SMTC-SSW-106-02-X-S [mm] "SQ Post Socket, 1x6 Pins, Vertical, 2.54mm Pitch, Female"
  rect 1.55x1.55 hole 1.04: 1(0,0)
  round 1.55 hole 1.04: 2(2.54,0) 3(5.08,0) 4(7.62,0) 5(10.16,0) 6(12.7,0)
  silkscreen extent -1.53,-1.2 14.23,1.2, body extent -1.52,-1.21 14.22,1.21, height 8.51
SOIC127P1032X285-18N [mm]
  rect 1.95x0.7 smd: 1(-4.725,5.08) 2(-4.725,3.81) 3(-4.725,2.54) 4(-4.725,1.27) 5(-4.725,0) 6(-4.725,-1.27) 7(-4.725,-2.54) 8(-4.725,-3.81) 9(-4.725,-5.08) 10(4.725,-5.08) 11(4.725,-3.81) 12(4.725,-2.54) 13(4.725,-1.27) 14(4.725,0) 15(4.725,1.27) 16(4.725,2.54) 17(4.725,3.81) 18(4.725,5.08)
  silkscreen extent -5.7,-5.76 3.4,5.78, body extent -5.16,-5.76 5.16,5.76, height 2.85
SSW-136-XX-YYY-D [mm]
  round 1.57 hole 1.04: 1(0,2.54) 2(0,0) 3(-2.54,2.54) 4(-2.54,0) 5(-5.08,2.54) 6(-5.08,0) 7(-7.62,2.54) 8(-7.62,0) 9(-10.16,2.54) 10(-10.16,0) 11(-12.7,2.54) 12(-12.7,0) 13(-15.24,2.54) 14(-15.24,0) 15(-17.78,2.54) 16(-17.78,0) 17(-20.32,0) 18(-20.32,2.54) 19(-22.86,2.54) 20(-22.86,0) 21(-25.4,2.54) 22(-25.4,0) 23(-27.94,2.54) 24(-27.94,0) 25(-30.48,2.54) 26(-30.48,0) 27(-33.02,2.54) 28(-33.02,0) 29(-35.56,2.54) 30(-35.56,0) 31(-38.1,2.54) 32(-38.1,0) 33(-40.64,2.54) 34(-40.64,0) 35(-43.18,2.54) 36(-43.18,0) 37(-45.72,2.54) 38(-45.72,0) 39(-48.26,2.54) 40(-48.26,0) 41(-50.8,2.54) 42(-50.8,0) 43(-53.34,2.54) 44(-53.34,0) 45(-55.88,2.54) 46(-55.88,0) 47(-58.42,2.54) 48(-58.42,0) 49(-60.96,2.54) 50(-60.96,0) 51(-63.5,2.54) 52(-63.5,0) 53(-66.04,2.54) 54(-66.04,0) 55(-68.58,2.54) 56(-68.58,0) 57(-71.12,2.54) 58(-71.12,0) 59(-73.66,2.54) 60(-73.66,0) 61(-76.2,2.54) 62(-76.2,0) 63(-78.74,2.54) 64(-78.74,0) 65(-81.28,2.54) 66(-81.28,0) 67(-83.82,2.54) 68(-83.82,0) 69(-86.36,2.54) 70(-86.36,0) 71(-88.9,2.54) 72(-88.9,0)
  silkscreen extent -90.43,-1.7 1.53,3.75, body extent -90.42,-1.18 1.52,3.78, height 12.39
"TSR 2-2450_TRP" [mil]
  round 48 / inner round 60 / far side round 48 hole 28 paste-99999 mask+0: 1(0,0) 2(100,0) 3(200,0)
  silkscreen extent -199,-158 382,167, body extent -186,-157 386,157, height 417

## Part data
2K2 220 470: library part Res_12K1_1%_0603, "-55℃~+155℃ 100mW 2.2kΩ 75V Thick Film Resistor ±1% ±100ppm/℃ 0603 Chip Resistor - Surface Mount ROHS (C309562)", Manuf_1=VISHAY, Manuf_Part_1="MCT 0603-50 1% P5 12K1", Distrib=FARNELL, ECCN_US/EU=n/a, Order=2325243
3V3 12V +5V: library part SML-010PTT86, "-20℃~+80℃ 130° 20mA 260mcd 3.2V 70mW Discrete Diode White Yellow Lens 1206 LED Indication - Discrete ROHS (C133134)", Manufacturer_Name="ROHM Semiconductor", Mouser Part Number=755-SML-010PTT86, Datasheet Link=https://componentsearchengine.com/Datasheets/1/SML-010PTT86.pdf, Manufacturer_Part_Number=SML-010PTT86, Mouser Price/Stock=https://www.mouser.co.uk/ProductDetail/ROHM-Semiconductor/SML-010PTT86?qs=4kLU8WoGk0sTbaHXE%252BLu9Q%3D%3D
5V_OUT1 5V_OUT2 12V_OUT1 12V_OUT2: "Connector (C592983)", Manufacturer_Name="TE Connectivity", Mouser2 Part Number=571-282834-2, Datasheet Link=https://componentsearchengine.com//282834-2.pdf, Manufacturer_Part_Number=282834-2, Mouser2 Price/Stock=https://www.mouser.com/Search/Refine.aspx?Keyword=571-282834-2
B1 B2 B3 B4 B5 B6 B7 B8 B9 B10 T1 T2 T3 T4 T5 T6 T7 T8 T9 T10: library part CMP-17439-000014-3, "-25℃~+85℃ 1 1x3P 2.5mm 3 3A 3P Brass Through Hole Tin XH Plugin,P=2.5mm Wire To Board Connector ROHS (C2908601)", Color=Natural, Contact Resistance=20mR, Current Rating=3A, Flammability Rating="UL94 V-0", Housing Color=White, Insulation Resistance=1GR, Max Operating Temperature=85°C, Max Voltage Rating (AC)=250V, Min Operating Temperature=-25°C, Connector Type=Header, Contact Finish - Mating=TIN, Contact Material=Brass, Contact Plating=Tin, Contact Shape=Square, Contact Type="Male Pin", Depth=5.75mm, Fastening Type=Detent, Gender=Male, Housing Material=Polyamide, Insulation Color=Natural, Insulation Material=Nylon, Lead Free="Lead Free", Lead Pitch=2.5mm, Length=9.9mm, Max Current Rating=3A, Max Voltage Rating (DC)=250V, Mount="Through Hole", Number Of Contacts=3, Number of Positions=3, Number Of Rows=1, Orientation=Straight, Packaging=Bulk, Pitch=2.5mm, REACH SVHC="No SVHC", Series=XH, Termination=Solder, Voltage Rating=250V, Voltage Rating (AC)=250V, Wire/Cable Gauge=22AWG
C1 MCAP1_A MCAP2_A MCAP3_A MCAP4_A MCAP5_A MCAP6_A MCAP7_A MCAP8_A: library part CMP-05427-000065-2, "Conductive Polymer Aluminum Solid Capacitors (OS-CON) 47uF ±20% 25V (C136280)", Capacitance=47uF, Case/Package=Radial, ESR (Equivalent Series Resistance)=30mR, Leakage Current=235uA, Max Operating Temperature=105°C, Min Operating Temperature=-55°C, Package Quantity=1000, Ripple Current=2.8A, Tolerance=20%, Voltage=25V, Diameter=6.3mm, Dissipation Factor=12%, Height=5.9mm, Height - Seated (Max)=0.236inch, Length=5.9mm, Life (Hours)=5000Hour, Mount="Surface Mount", Number of Pins=6, Packaging="Tape and Reel", Polarity=Polar, REACH SVHC="No SVHC", Ripple Current (AC)=2.8A, RoHS Compliant=Yes, Series="OS-CON™, SVPF", Termination=SMD/SMT, Voltage Rating=25V, Voltage Rating (DC)=25V
C2 C4 C7 C10: library part CMP-2100-03643-1, "Chip Capacitor, 0.1 uF, +/- 10%, 50 V, -55 to 125 degC, 0603 (1608 Metric), RoHS, Tape and Reel (C77055)", Capacitance=100nF, Case Code (Imperial)=0603, Case Code (Metric)=1608, Dielectric=X7R, Dielectric Material=Ceramic, Insulation Resistance=10GR, Manufacturer=Murata, Max Operating Temperature=125degC, Min Operating Temperature=-55degC, Package Description="2-Pin Surface Mount Device, Body 1.6 x 0.8 mm", Package Quantity=1, Tolerance=10%, Voltage=50V, Case/Package=0603, Contact Plating=Tin, Datasheet URL=http://psearch.en.murata.com/capacitor/product/GRM188R71H104KA93%23.pdf, Datasheet Version=42675.0, Depth=0.8mm, Height=0.8mm, Lead Free=LeadFree, Length=1.6mm, Manufacturer URL=http://www.murata.com/, Material=Ceramic, Mount=SurfaceMount, Number of Pins=2, Package Reference=0603, Packaging=TapeandReel, Radiation Hardening=No, REACH SVHC=NoSVHC, RoHSCompliant=true, Termination=SMD/SMT, Thickness=0.035inch, Voltage Rating=50V, Voltage Rating (DC)=50V, Width=0.8mm
C3 C6: library part CMP-08246-001069-1, "10uF 50V X7R ±10% 1210 Multilayer Ceramic Capacitors MLCC - SMD/SMT ROHS ( / C53084452)"
C5: library part CMP-05428-000328-1, "Molded Tantalum Polymer Capacitor 100uF 20% 10V life 2000Hours SMD 2917 (C147766)", Capacitance=100uF, Case Code (Imperial)=2917, Case Code (Metric)=7343, ESR (Equivalent Series Resistance)=45mR, Leakage Current=100uA, Max Operating Temperature=105°C, Min Operating Temperature=-55°C, Package Quantity=3000, Ripple Current=1.7A, Tolerance=20%, Voltage=10V, Case/Package=2917, Construction=Flat, Depth=4.3mm, Dissipation Factor=10%, Features="General Purpose", Height=1.9mm, Height - Seated (Max)=0.079inch, Lead Free="Lead Free", Length=7.3mm, Mount="Surface Mount", Number of Pins=2, Packaging="Tape and Reel", Polarity=Polar, Radiation Hardening=No, REACH SVHC="No SVHC", RoHS Compliant=Yes, Series="POSCAP™ TPC", Termination=SMD/SMT, Voltage Rating=10V, Voltage Rating (DC)=10V, Width=4.3mm
C8 C9: library part CMP-03422-001167-1, "10uF 25V X5R ±10% 1206 Multilayer Ceramic Capacitors MLCC - SMD/SMT ROHS (C128855)", Capacitance="1 uF", Manufacturer=Yageo, Package=CC1206-1.25, Temperature="-55°C to +125°C", Temperature Characteristic=X5R, Temperature Coefficient=15%, Temperature Range High=+125°C, Temperature Range Low=-55°C, Tolerance=0.1, Voltage Rating="25 V", Automotive=No, Automotive Grade=NA, Category=Cap, ComponentLink2Description=Datasheet, ComponentLink2URL=http://www.yageo.com/documents/recent/UPY-NP0X7R_HV_1KV-to-3KV_11.pdf, Device Class L1="Passive Components", Device Class L2=Capacitors, Device Class L3="Ceramic Capacitors", Digikey Description="CAP CER 1UF 25V X5R 1206", Footprint Url=http://www.yageo.com/exep/pages/download/literatures/UPY-C_GEN_24.pdf, Height=1.45mm, Lead Free=Yes, Manufacturer Part Number=CC1206KKX5R8BB105, Material=Ceramic, Mouser Description="Multilayer Ceramic Capacitors MLCC - SMD/SMT 1.0uF 25V X5R 10%", Octopart=https://octopart.com/cc1206kkx5r8bb105-yageo-20779154, RoHS=TRUE
CN11 CN12: "Connector", Manufacturer_Name=SAMTEC, Datasheet Link=http://suddendocs.samtec.com/prints/ssw-1xx-xx-xxx-x-xx-xxx-xx-mkt.pdf, Manufacturer_Part_Number=SSW-136-01-S-D
D1: "-55℃~+125℃ 1A 30A 40V 500uA@40V 550mV@1A SMA(DO-214AC) Schottky Diodes ROHS (C54798)", Manufacturer_Name=onsemi, Mouser Part Number=863-MBRA140T3G, Arrow Part Number=MBRA140T3G, Arrow Price/Stock=https://www.arrow.com/en/products/mbra140t3g/on-semiconductor?utm_currency=USD&region=nac, Datasheet Link=https://www.onsemi.com/pub/Collateral/MBRA140T3-D.PDF, Height=2.2mm, Manufacturer_Part_Number=MBRA140T3G, Mouser Price/Stock=https://www.mouser.co.uk/ProductDetail/onsemi/MBRA140T3G?qs=3JMERSakebqN9fBNId59Xg%3D%3D
D2: library part CMP-1055-00390-1, "-65℃~+150℃ 190A 300uA@40V 40V 500mV@5A 5A SMC(DO-214AB) Schottky Diodes ROHS (C31849)", Manufacturer="On Semiconductor", ComponentLink1Description="Manufacturer URL", ComponentLink1URL=http://www.onsemi.com/, ComponentLink2Description=Datasheet, ComponentLink2URL=http://www.onsemi.cn/pub_link/Collateral/MBRS540T3-D.PDF, ComponentLink3Description="Package Specification", ComponentLink3URL=http://www.onsemi.com/pub_link/Collateral/403-03.PDF, Configuration=Single, DatasheetVersion="Rev. 8", IFSM Max (A)=190, Mounting Technology="Surface Mount", PackageDescription="2-Pin Small Molded Package, J-Bend Lead, Body 5.845 x 6.855 mm", PackageReference=SMC-2-403-03, PackageVersion="Rev. E, 08/2005", Packing="Tape and Reel", PartNumber=MBRS540T3G, RoHS=TRUE
D3: library part CMP-1667-00003-3, "DIODE SCHOTTKY 40V 3A SMA ( / C15570)", Average Rectified Current=3A, Capacitance=250pF, Case/Package=SMA, Forward Voltage=500mV, Max Forward Surge Current (Ifsm)=80A, Max Operating Temperature=125°C, Max Repetitive Reverse Voltage (Vrrm)=40V, Max Reverse Current=500uA, Min Operating Temperature=-55°C, Package Quantity=5000, Contact Plating=Tin, Current=3A, Current Rating=3A, Element Configuration=Single, Forward Current=3A, Height=2.3mm, Lead Free="Lead Free", Length=4.6mm, Max Reverse Voltage (DC)=40V, Mount="Surface Mount", Number of Pins=2, Output Current=3A, Packaging="Tape and Reel", Peak Non-Repetitive Surge Current=80A, Polarity=Standard, Radiation Hardening=No, REACH SVHC="No SVHC", RoHS Compliant=Yes, Series=-, Termination=SMD/SMT, Voltage=40V, Voltage Rating (DC)=40V, Weight=0.002258oz, Width=2.92mm
DNP: library part Res_12K1_1%_0603, "0 (DNP)", Manuf_1=VISHAY, Manuf_Part_1="MCT 0603-50 1% P5 12K1", Distrib=FARNELL, ECCN_US/EU=n/a, Order=2325243
HDMI_IO: library part CMP-2000-05607-2, "CONN RCPT HDMI 19POS SMD R/A", Case/Package=Metal, Color=Black, Current Rating=500mA, Flammability Rating="UL94 V-0", Max Operating Temperature=85°C, Max Voltage Rating (DC)=40V, Min Operating Temperature=-20°C, Package Quantity=350, Body Material=Metal, Contact Material="Copper Alloy", Contact Plating=Gold, Depth=12.15mm, Gender=Female, Halogen Free="Low Halogen", Housing Color=Black, Housing Material=Thermoplastic, Lead Free="Lead Free", Length=15mm, Mount="Surface Mount", Number of Circuits=19, Number Of Contacts=19, Number of Ports=1, Number of Positions=19, Number of Terminals/Pins=19, Orientation="Right Angle", Packaging="Cut Tape", Pitch=0.5mm, Radiation Hardening=No, RoHS Compliant=Yes, Series=47151, Shielding=Shielded, Termination=SMD/SMT, Voltage Rating=40V, Voltage Rating (DC)=40V, Weight=0.072312oz
I1: library part CMP-07248-000061-1, "2.3A 22uH 3.3A 96mΩ AEC-Q200 ±20% SMD,6x6mm Power Inductors ROHS (C2044314)", DC Resistance (DCR)=96mR, Inductance=22uH, Inductance Tolerance=20%, RMS Current (Irms)=2.3A, Saturation Current=3.3A, Mount="Surface Mount", Packaging="Cut Tape", REACH SVHC="No SVHC", RoHS Compliant=Yes
I2S_OUT: library part CMP-1502-01332-4, "THT Vertical Socket Header WR-PHD, Pitch 2.54 mm, Single Row, 10 pins", Color=Black, Contact Resistance=20mΩ, Current Rating=3A, Flammability Rating="UL94 V-0", Insulation Resistance=1GΩ, Max Operating Temperature=125°C, Min Operating Temperature=-40°C, Operating Supply Voltage=250V, Connector Type="Header, Socket", Contact Gender=Female, Contact Material=Copper, Contact Plating=Gold, Gender=Female, Height=8.5mm, Housing Material=PBT, Insulation=Insulated, Lead Free="Lead Free", Lead Pitch=2.54mm, Length=25.9mm, Mount="Through Hole", Number Of Contacts=10, Number of Pins=10, Number of Positions=10, Number Of Rows=1, Orientation=Vertical, Pitch=2.54mm, RoHS=Compliant, Termination="Through Hole", Voltage Rating=250V, Width=25.9mm
IC1 IC2 IC3: "Integrated Circuit (C108880)", Manufacturer_Name=Toshiba, Mouser2 Part Number=757-TBD62083AFWGEL, Datasheet Link=https://componentsearchengine.com//TBD62083AFWG,EL.pdf, Height=2.85mm, Manufacturer_Part_Number=TBD62083AFWG,EL, Mouser2 Price/Stock=https://www.mouser.com/Search/Refine.aspx?Keyword=757-TBD62083AFWGEL
IO1 IO2 IO3 IO4: "Connector", Manufacturer_Name="TE Connectivity", Mouser2 Part Number=571-282834-2, Datasheet Link=https://componentsearchengine.com//282834-2.pdf, Manufacturer_Part_Number=282834-2, Mouser2 Price/Stock=https://www.mouser.com/Search/Refine.aspx?Keyword=571-282834-2
J1 J2: library part CMP-1502-00188-1, "DC Power Jack Connector WR-DC, Male, Right Angled, THT, 5 A, 24 V (C5441017)", Manufacturer="Wurth Elektronik", Operating Temperature=-40to85degC, Rated Current=5A, Working Voltage=24V, Datasheet URL=http://katalog.we-online.de/em/datasheet/6941xx301002.pdf, Gender=Male, Manufacturer URL=http://www.we-online.de, Mounting Technology=THT, Opening Diameter=6.4mm, Orientation=RightAngled, Package Reference=694106301002, Packaging=Bag, Part Number=694106301002, Plug Inner Diameter=2.05mm, Plug Outer Diameter=5.5mm, Publisher=WurthElektronik
M1A M1B M2A M2B M3A M3B M4A M4B M5A M5B M6A M6B M7A M7B M8A M8B: "1 1x8P 2.54mm 8P Square Hole Through Hole Top Plugin,P=2.54mm Female Headers ROHS (C27438)", Manufacturer_Name="TE Connectivity", Datasheet Link=https://componentsearchengine.com/Datasheets/1/5-535541-6.pdf, Height=6.73mm, Manufacturer_Part_Number=5-535541-6
MCAP1_B MCAP2_B MCAP3_B MCAP4_B MCAP5_B MCAP6_B MCAP7_B MCAP8_B: library part CMP-08246-001069-1, "10uF 50V X7R ±10% 1210 Multilayer Ceramic Capacitors MLCC - SMD/SMT ROHS (C596319)"
MOTOR1 MOTOR2 MOTOR3 MOTOR4 MOTOR5 MOTOR6 MOTOR7 MOTOR8: library part CMP-1755-00007-1, "Male Header, Pitch 2.5 mm, 1 x 4 Position, Height 6.1 mm, Tail Length 3.4 mm, -25 to 85 degC, RoHS, Bulk (C157925)", ComponentLink1Description="Manufacturer URL", ComponentLink1URL=http://www.jst.com/home2.html, ComponentLink2Description=Datasheet, ComponentLink2URL=http://www.jst-mfg.com/product/pdf/eng/eXH.pdf, DatasheetVersion=May-16, PackageDescription="Male Header, Pitch 2.5 mm, 1 x 4 Position, Height 6.1 mm, Tail Length 3.4 mm", PackageReference=S4B-XH-A(LF)(SN)
Photometry PORT-1 PORT-2 PORT-3 PORT-4 PORT-5 PORT-6 PORT-7 PORT-8 PORT-9 PORT-10 UART: library part CMP-1502-01725-1, "Modular Jack WR-MJ, Plastic, Vertical Entry, THT, 8P8C (C86492)", Contact Resistance=20mOhm, Manufacturer="Wurth Elektronik", Operating Temperature=-40to85degC, Rated Current=1.5A, Withstanding Voltage=1000VAC, Working Voltage=120VAC, Compliance=Leadfree/RoHS, Datasheet URL=https://katalog.we-online.de/em/datasheet/615008138021.pdf, Entrance=Vertical, Manufacturer URL=http://www.we-online.de, Mounting Technology=THT, Package Reference=615008138021, Packaging=Tray, Part Number=615008138021, Pin Number=8P8C, Port=1x1, Publisher=WurthElektronik
R1: library part Res_12K1_1%_0603, "-55℃~+155℃ 100mW 680kΩ 75V Thick Film Resistor ±1% ±100ppm/℃ 0603 Chip Resistor - Surface Mount ROHS (C137690)", Manuf_1=VISHAY, Manuf_Part_1="MCT 0603-50 1% P5 12K1", Distrib=FARNELL, ECCN_US/EU=n/a, Order=2325243
R2 R5: library part Res_12K1_1%_0603, "-55℃~+155℃ 100kΩ 100mW 75V Thick Film Resistor ±1% ±100ppm/℃ 0603 Chip Resistor - Surface Mount ROHS (C14675)", Manuf_1=VISHAY, Manuf_Part_1="MCT 0603-50 1% P5 12K1", Distrib=FARNELL, ECCN_US/EU=n/a, Order=2325243
R3: library part Res_12K1_1%_0603, "-55℃~+155℃ 100mW 10kΩ 75V Thick Film Resistor ±1% ±100ppm/℃ 0603 Chip Resistor - Surface Mount ROHS (C99198)", Manuf_1=VISHAY, Manuf_Part_1="MCT 0603-50 1% P5 12K1", Distrib=FARNELL, ECCN_US/EU=n/a, Order=2325243
R4: library part Res_12K1_1%_0603, "-55℃~+155℃ 100mW 3.24kΩ 75V Thick Film Resistor ±1% ±100ppm/℃ 0603 Chip Resistor - Surface Mount ROHS (C227860)", Manuf_1=VISHAY, Manuf_Part_1="MCT 0603-50 1% P5 12K1", Distrib=FARNELL, ECCN_US/EU=n/a, Order=2325243
R12 R13 R14 R15 R16 R17 R18 R19 R20 R21 R22 R23 R24 R25 R26 R27 R28 R29 R30 R31 R32 R33 R34 R35: library part Res_12K1_1%_0603, "-55℃~+155℃ 100mW 10kΩ 75V Thick Film Resistor ±100ppm/℃ ±5% 0603 Chip Resistor - Surface Mount ROHS (C99198)", Manuf_1=VISHAY, Manuf_Part_1="MCT 0603-50 1% P5 12K1", Distrib=FARNELL, ECCN_US/EU=n/a, Order=2325243
SPI_BUS?: library part CMP-17439-000051-1, "-25℃~+85℃ 1 100V 15.95mm 1x6P 2A 2mm 6 6.6mm 6P 7mm Auxiliary Solder Pin Beige Copper Alloy PA PH Surface Mount,Vertical Tin UL94V-0 SMD,P=2mm Wire To Board Connector ROHS (C471518)", Color=Natural, Contact Resistance=10mR, Current Rating=2A, Flammability Rating="UL94 V-0", Insulation Resistance=1GR, Max Operating Temperature=85°C, Min Operating Temperature=-25°C, Voltage Rating=100V, Connector Type=Header, Contact Finish - Mating=TIN, Contact Material="Copper Alloy", Contact Mating Length=0.13inch, Contact Plating=Tin, Contact Shape=Square, Contact Type="Male Pin", Fastening Type=Detent, Gender=Male, Height=9.4mm, Housing Color=Natural, Housing Material=Nylon, Insulation Color=Natural, Insulation Height=0.26inch, Insulation Material=Nylon, Lead Free="Lead Free", Lead Pitch=2mm, Length=13.9mm, Mated Stacking Heights=8.6mm, Mount="Surface Mount", Number Of Contacts=6, Number of Poles=6, Number of Positions=6, Number Of Rows=1, Orientation=Straight, Packaging="Tape and Reel", Pitch=2mm, REACH SVHC="No SVHC", Series=PH, Termination=Solder, Voltage Rating (AC)=100V, Width=5.5mm, Working Voltage=100V
TSR_12V: library part CMP-49942-000013-2, "DC DC CONVERTER 5V 10W", Case/Package=SIP, Max Operating Temperature=85°C, Max Supply Voltage=36V, Min Operating Temperature=-40°C, Min Supply Voltage=6.5V, Output Current=2A, Output Power=10W, Output Voltage=5V, Switching Frequency=1.2MHz, Height=10.1mm, Mount="Through Hole", NexarPartId=71799544, Number of Outputs=1, RoHS=Non-Compliant, Width=7.5mm
U1_5V_: library part CMP-0323-00172-3, "Buck Step Down Regulator with 5.5 to 36 V Input and 1.23 to 31 V Output, -40 to 125 degC, 8-Pin SOIC (D), Green (C10111)", Manufacturer="Texas Instruments", Rating=Catalog, Switch Current Limit(Typ)(A)=3, Code_JEDEC=MS-012AA, ComponentLink1Description=Datasheet, ComponentLink1URL=http://www.ti.com/general/docs/lit/getliterature.tsp?genericPartNumber=TPS5420&fileType=pdf, ComponentLink2Description="Package Specification", ComponentLink2URL=http://www.ti.com/litv/pdf/msoi002j, ComponentLink3Description="URL Link1", ComponentLink3URL="Samples URL:http://www.ti.com/product/tps5420#samples", DatasheetVersion=SLVS642C, Duty Cycle(Max)(%)=87, Eco-Plan="Green (RoHS & no Sb/Br)", Iout(Max)(A)=2, Iq(Typ)(mA)=3, Mounting Technology="Surface Mount", PackageDescription="8-Pin Plastic Small Outline Integrated Circuit, 4.9 x 3.9 mm, Pitch 1.27 mm Pitch", PackageReference=D0008A, PackageVersion="revM, Jun-2011", PartNumber=TPS5420DR, Regulated Outputs(#)=1, SubFamily="Step-Down Regulator", Topology=Buck, Vin(Max)(V)=36, Vin(Min)(V)=5.5, Vout(Max)(V)=31, Vout(Min)(V)=1.23
U3_3V3: library part CMP-1679-00010-1, "Low-Dropout Positive Fixed Voltage Regulator, 1 A, 3.3 V Output Voltage, 0 to 125 degC, 4-Pin SOT-223 (318H-01), Pb-Free, Tape and Reel (C26537)", Case Code (Imperial)=0603, Case Code (Metric)=1608, Max Operating Temperature="155 degC", Min Operating Temperature="-55 degC", Package Quantity=5000, Power Rating="100 mW", Resistance="220 kohm", Tolerance=1%, Type (Resistor)="Thick Film", Voltage Rating="75 V", Case\Package=0603, ComponentLink1Description="Manufacturer URL", ComponentLink1URL=http://www.onsemi.com/, ComponentLink2Description=Datasheet, ComponentLink2URL=http://www.onsemi.com/pub_link/Collateral/NCP1117-D.PDF, DatasheetVersion="Rev. 27, 09/2014", Height="0.45 mm", Length="1.55 mm", Mount="Surface Mount", PackageDescription="4-Pin Small Outline Transistor, Body 6.5 x 3.5 mm, Pitch 2.3 mm", PackageReference=SOT-223-4-318H-01_A, Packaging="Tape and Reel", Radiation Hardening=No, REACH SVHC=Unknown, RoHSCompliant=true, Weight="7.1E-05 oz", Width="0.85 mm"

## Via types
v1: diameter 0.45, hole 0.3, Top Layer to Bottom Layer, tented both sides, 413 vias
v2: diameter 0.7, hole 0.5, Top Layer to Bottom Layer, tented bottom, 173 vias
v3: diameter 0.6, hole 0.3, Top Layer to Bottom Layer, tented both sides, 12 vias
v4: diameter 0.5, hole 0.3, Top Layer to Bottom Layer, tented both sides, 10 vias
v5: diameter 0.5, hole 0.35, Top Layer to Bottom Layer, tented both sides, 7 vias
v6: diameter 5.5, hole 3, Top Layer to Bottom Layer, tented bottom, 6 vias
v7: diameter 0.6, hole 0.305, Top Layer to Bottom Layer, tented both sides, 6 vias
v8: diameter 0.8, hole 0.4, Top Layer to Bottom Layer, tented both sides, 2 vias
v9: diameter 0.45, hole 0.305, Top Layer to Bottom Layer, tented both sides, 2 vias
v10: diameter 0.7, hole 0.3, Top Layer to Bottom Layer, tented both sides, 1 vias
v11: diameter 0.4, hole 0.3, Top Layer to Bottom Layer, tented both sides, 1 vias
v12: diameter 3, hole 3, Top Layer to Bottom Layer, tented both sides, 1 vias

## Nets (pads, with @x,y where several pads share a name; then routed paths per layer and width w, separated by ;. In a path a pad name is that pad's centre, name@x,y a point inside that pad or via, vN(x,y) a via of type N, cw(c..) or ccw(c..) an arc to the next point about the centre after c; other vN are vias at no path point)
+3V3: 220.2 BOOT.2 C9.1 C10.2 DNP.1 M1A.2 M2A.2 M3A.2 M4A.2 M5A.2 M6A.2 M7A.2 M8A.2 R12.1 R15.1 R18.1 R21.1 R24.1 R27.1 R30.1 R33.1 SPI_BUS?.5 U3_3V3.2 U3_3V3.4 | length 402.3
  Top Layer w0.3: DNP.1@99.401,133.667 99.537,133.53 101.285,133.53 BOOT.2@102.086,134.331 ; BOOT.2@102.086,134.585 103.091,135.59 150.529,135.59 158.607,143.668 183.961,143.668 v1(183.971,143.677) ; SPI_BUS?.5@168.1,119.162 168.148,119.114 v7(168.148,115.697)
  Top Layer w0.4: U3_3V3.4@51.054,157.099 52.492,155.661 53.594,155.661 ; 220.2@53.642,154.176 53.594,154.224 53.594,155.661 ; R12.1@59.416,152.787 59.416,155.661 ; M1A.2@70.398,162.467 70.398,155.661 ; R15.1@83.199,152.787 83.199,155.661 ; M2A.2@93.939,162.467 93.939,155.661 ; R18.1@106.281,152.787 106.355,152.861 106.355,155.661 ; M3A.2@117.48,162.467 117.48,155.661 ; R21.1@129.477,152.787 129.477,155.661 ; M4A.2@141.021,162.467 141.021,155.661 ; R24.1@153.406,152.787 153.406,155.661 ; M5A.2@164.562,162.467 164.562,155.661 ; R27.1@175.787,152.787 175.787,155.661 ; R33.1@184.537,112.068 187.786,112.068 187.805,112.049 ; R30.1@184.537,135.011 187.653,135.011 187.805,135.163 ; M6A.2@188.103,162.467 188.103,155.661 ; M8A.2@194.55,99.443 194.246,99.443 193.92,99.768 193.832,99.768 187.805,105.796 187.805,112.049 ; M7A.2@194.55,123.91 187.882,123.91 187.805,123.987 ; 53.594,155.661 59.416,155.661 ; 59.416,155.661 70.398,155.661 ; 70.398,155.661 83.199,155.661 ; 83.199,155.661 93.939,155.661 ; 93.939,155.661 106.355,155.661 ; 106.355,155.661 117.48,155.661 ; 117.48,155.661 129.477,155.661 ; 129.477,155.661 141.021,155.661 ; 141.021,155.661 153.406,155.661 ; 153.406,155.661 164.562,155.661 ; 164.562,155.661 175.787,155.661 ; 175.787,155.661 188.103,155.661 ; 187.805,112.049 187.805,113.323 v7(187.815,113.334) 187.805,113.344 187.805,123.987 ; 187.805,123.987 187.805,135.163 ; 187.805,135.163 v1(187.805,143.482) 192.013,147.69 192.013,153.935 190.287,155.661 188.103,155.661
  Top Layer w0.8: C9.1@41.95,159.868 41.95,159.995 ; C10.2@41.95,161.309 41.95,159.995 ; C9.1@42.133,159.026 42.033,159.126 42.033,159.911 41.95,159.995
  Top Layer w1: C9.1@42.133,158.704 44.219,158.704 U3_3V3.2@44.376,158.547 ; U3_3V3.2@44.36,158.547 U3_3V3.2@44.376,158.547 ; U3_3V3.4@50.66,158.547 U3_3V3.2@44.376,158.547
  Bottom Layer w0.3: v7@168.243,115.729 174.689,115.729 177.083,113.335 v7(187.815,113.334) v7(187.815,113.334)
  Bottom Layer w0.4: v1(183.971,143.677) 187.596,143.677 187.791,143.482 v1(187.805,143.482)
+5V: 5V_OUT1.2 5V_OUT2.2 470.2 B1.1 B2.1 B3.1 B4.1 B5.1 B6.1 B7.1 B8.1 B9.1 B10.1 C5.2 C6.1 C7.2 C8.1 D1.2 I1.2 I2S_2.6 I2S_OUT.2 Photometry.6 PORT-1.6 PORT-2.6 PORT-3.6 PORT-4.6 PORT-5.6 PORT-6.6 PORT-7.6 PORT-8.6 PORT-9.6 PORT-10.6 R3.1 T1.1 T2.1 T3.1 T4.1 T5.1 T6.1 T7.1 T8.1 T9.1 T10.1 TSR_12V.3 U3_3V3.3 UART.6 | length 841.6
  Top Layer w0.4: PORT-10.6@30.566,26.423 32.088,24.901 40.977,24.901 43.729,27.653 46.63,27.653 PORT-9.6@47.86,26.423 ; PORT-9.6@47.838,26.423 49.36,24.901 58.249,24.901 61.001,27.653 63.902,27.653 PORT-8.6@65.132,26.423 ; PORT-8.6@65.237,26.423 66.759,24.901 75.648,24.901 78.4,27.653 81.301,27.653 PORT-7.6@82.531,26.423 ; PORT-7.6@82.382,26.423 83.904,24.901 92.793,24.901 95.545,27.653 98.446,27.653 PORT-6.6@99.676,26.423 ; PORT-6.6@99.781,26.423 101.303,24.901 110.192,24.901 112.944,27.653 115.845,27.653 PORT-5.6@117.075,26.423 ; PORT-5.6@117.053,26.423 118.575,24.901 127.464,24.901 130.216,27.653 133.117,27.653 PORT-4.6@134.347,26.423 ; PORT-4.6@134.452,26.423 135.974,24.901 144.863,24.901 147.615,27.653 150.516,27.653 PORT-3.6@151.746,26.423 ; PORT-3.6@151.724,26.423 153.246,24.901 162.135,24.901 164.887,27.653 167.788,27.653 PORT-2.6@169.018,26.423 ; PORT-2.6@168.996,26.423 170.518,24.901 179.407,24.901 182.159,27.653 185.06,27.653 PORT-1.6@186.29,26.423 187.768,24.945 195.679,24.945 203.837,33.102 203.837,70.102 201.803,72.136 195.707,72.136 192.913,74.93 192.913,76.327 191.468,77.772 191.435,77.772 191.035,78.172 I2S_2.6@190.724,78.172 ; I2S_2.6@190.23,78.141 190.228,78.14 I2S_2.6@190.308,78.06
  Top Layer w0.5: 28.142,17.038 T10.1@29.235,17.038 ; C6.1@37.914,141.253 R3.1@37.914,143.791 ; D1.2@118.63,122.286 119.036,122.693 120.209,122.693 122.053,124.536 164.582,124.536 164.582,124.548 ; 164.574,125.257 UART.6@164.574,127.134 ; 164.582,125.249 164.582,124.548 ; 173.394,124.548 164.582,124.548 ; 173.431,124.548 174.606,123.373 174.606,106.479 v3(174.616,106.47) ; 470.2@174.311,87.998 174.511,88.198 174.511,89.036 174.625,89.15 v1(174.625,89.154)
  Top Layer w0.6: C7.2@42.009,154.225 C8.1@42.009,156.272
  Top Layer w0.7: 17.928,40.548 16.002,42.473 16.002,62.939 26.339,73.276 26.339,115.062 ; 21.555,40.548 23.876,38.227 23.876,21.303 28.142,17.038 ; 26.234,116.462 26.234,133.933 ; T10.1@29.235,17.038 36.903,17.038 46.53,17.038 54.198,17.038 63.824,17.038 71.492,17.038 81.119,17.038 88.787,17.038 98.413,17.038 106.081,17.038 115.708,17.038 123.376,17.038 133.003,17.038 140.671,17.038 150.297,17.038 157.965,17.038 167.592,17.038 175.26,17.038 184.886,17.038 B1.1@192.554,17.038
  Top Layer w0.8: 5V_OUT1.2@21.59,136.779 21.781,136.588 22.838,136.588 23.325,136.101 ; 26.309,116.26 v3(26.923,115.646) 26.339,115.062 ; C5.2@41.368,141.016 C5.2@42.139,141.787 ; 43.344,141.787 44.92,143.362 44.92,155.897 44.57,156.247 U3_3V3.3@44.36,156.247 ; v3(93.929,115.646) 115.056,115.646 118.63,119.22 D1.2@118.63,122.286
  Top Layer w1: 17.928,40.548 5V_OUT2.2@19.794,40.548 21.555,40.548 ; 19.05,146.402 15.949,143.301 15.949,137.975 17.145,136.779 5V_OUT1.2@21.59,136.779 ; 22.791,136.635 23.325,136.101 24.384,135.042 ; 24.384,135.002 25.194,134.192 25.848,134.192 ; 26.107,133.933 25.848,134.192 ; 32.422,136.524 30.091,134.192 25.848,134.192 ; C8.1@42.136,156.213 U3_3V3.3@43.887,156.213 ; C5.2@42.139,141.787 43.344,141.787 ; U3_3V3.3@44.41,156.213 U3_3V3.3@44.469,156.154
  Top Layer w1.5: C6.1@37.914,141.253 38.082,141.086
  Top Layer w2: 19.05,146.402 TSR_12V.3@19.05,148.59 ; 5V_OUT1.2@21.226,136.762 5V_OUT1.2@22.283,136.762 ; 32.422,136.524 32.422,137.591 32.547,137.716 32.547,140.027 I1.2@32.722,140.202
  Top Layer w2.7: I1.2@32.893,141.721 C6.1@36.304,141.721 ; C6.1@36.558,141.721 38.082,141.721 ; 38.717,141.721 C5.2@41.855,141.721
  Bottom Layer w0.4: T10.1@29.202,17.071 T10.1@29.235,17.038 ; PORT-10.6@30.639,26.305 PORT-10.6@30.639,26.423
  Bottom Layer w0.5: Photometry.6@171.859,100.965 171.982,100.842 174.498,100.842 ; v3@174.602,106.429 174.602,88.415 176.171,86.846 183.388,79.629 184.877,78.14 I2S_OUT.2@186.164,78.14 I2S_2.6@190.228,78.14
  Bottom Layer w0.6: T10.1@29.193,17.185 28.116,17.185 27.287,18.014 27.287,22.952 PORT-10.6@30.639,26.305
  Bottom Layer w1: v3(26.923,115.646) v3(93.929,115.646)
+12V: 2K2.2 12V_OUT2.2 C1.2 C2.2 C3.1 D2.2 I2S_OUT.1 IC1.10 IC2.10 IC3.10 J1.1 PORT-1.8 PORT-2.8 PORT-3.8 PORT-4.8 PORT-5.8 PORT-6.8 PORT-7.8 PORT-8.8 PORT-9.8 PORT-10.8 R1.1 TSR_12V.1 U1_5V_.7 | length 553.5
  Top Layer w0.3: 33.253,152.667 37.05,152.667 37.137,152.58 ; 37.139,152.58 37.314,152.404 37.314,152.326 37.41,152.23 R1.1@37.487,152.23 ; 2K2.2@174.382,83.73 174.382,83.68 174.682,83.38 174.732,83.38 177.432,80.68 I2S_OUT.1@186.164,80.68
  Top Layer w0.5: U1_5V_.7@33.246,150.813 U1_5V_.7@33.253,150.82 ; v3@46.064,50.128 v3(46.101,50.165) 47.695,50.165 47.734,50.126 IC3.10@47.734,49.539 ; v8(110.236,42.926) 112.32,45.01 115.97,45.01 IC2.10@117.079,43.901 ; IC1.10@135.748,63.967 135.748,63.94 145.034,54.654 v8(145.034,45.974)
  Top Layer w0.7: U1_5V_.7@33.253,150.82 33.253,152.667 33.253,152.913
  Top Layer w0.8: PORT-10.8@28.099,26.423 30.738,23.784 45.448,23.784 ; PORT-9.8@45.394,26.423 45.394,23.838 45.448,23.784 ; PORT-8.8@62.688,26.423 62.688,23.942 62.847,23.784 ; PORT-7.8@79.983,26.423 79.983,24.047 80.246,23.784 ; PORT-6.8@97.277,26.423 97.277,23.797 97.264,23.784 ; PORT-5.8@114.572,26.423 114.572,23.82 114.536,23.784 ; PORT-4.8@131.867,26.423 131.867,23.842 131.808,23.784 ; PORT-3.8@149.161,26.423 149.161,23.829 149.207,23.784 ; 166.456,23.887 PORT-2.8@166.456,26.423 ; 183.75,23.898 PORT-1.8@183.75,26.423 ; v10(196.742,23.784) 149.207,23.784 ; 45.448,23.784 62.847,23.784 ; 62.847,23.784 80.246,23.784 ; 80.246,23.784 97.264,23.784 ; 97.264,23.784 114.536,23.784 ; 114.536,23.784 131.808,23.784 ; 131.808,23.784 149.207,23.784
  Top Layer w1.2: 26.662,159.258 26.716,159.312
  Top Layer w2: v3@21.209,157.734 v3(21.717,157.734) ; v3(22.479,157.734) v3(21.717,157.734) ; 26.716,159.312 23.295,159.312 v3(21.717,157.734) ; 28.308,159.554 D2.2@28.308,167.894 ; 29.337,159.312 29.578,159.554
  Top Layer w2.2: 26.716,159.312 29.337,159.312 31.188,159.312 33.26,157.24 ; 33.26,153.592 33.26,157.24 ; 33.26,157.492 33.26,157.24